# Altium PCB Balancer-v7.0.2.PcbDoc
Units mm, origin at the board's own origin, x right, y up, seen from the top; angles counter-clockwise.
Board outline 72.55 x 29.5 mm, 2 copper layers (Top Layer, Bottom Layer), stack 0.78 mm thick; 20 components, 16 nets, 58 pads, 112 vias.
Unrouted connection lines stored in the file: 10.
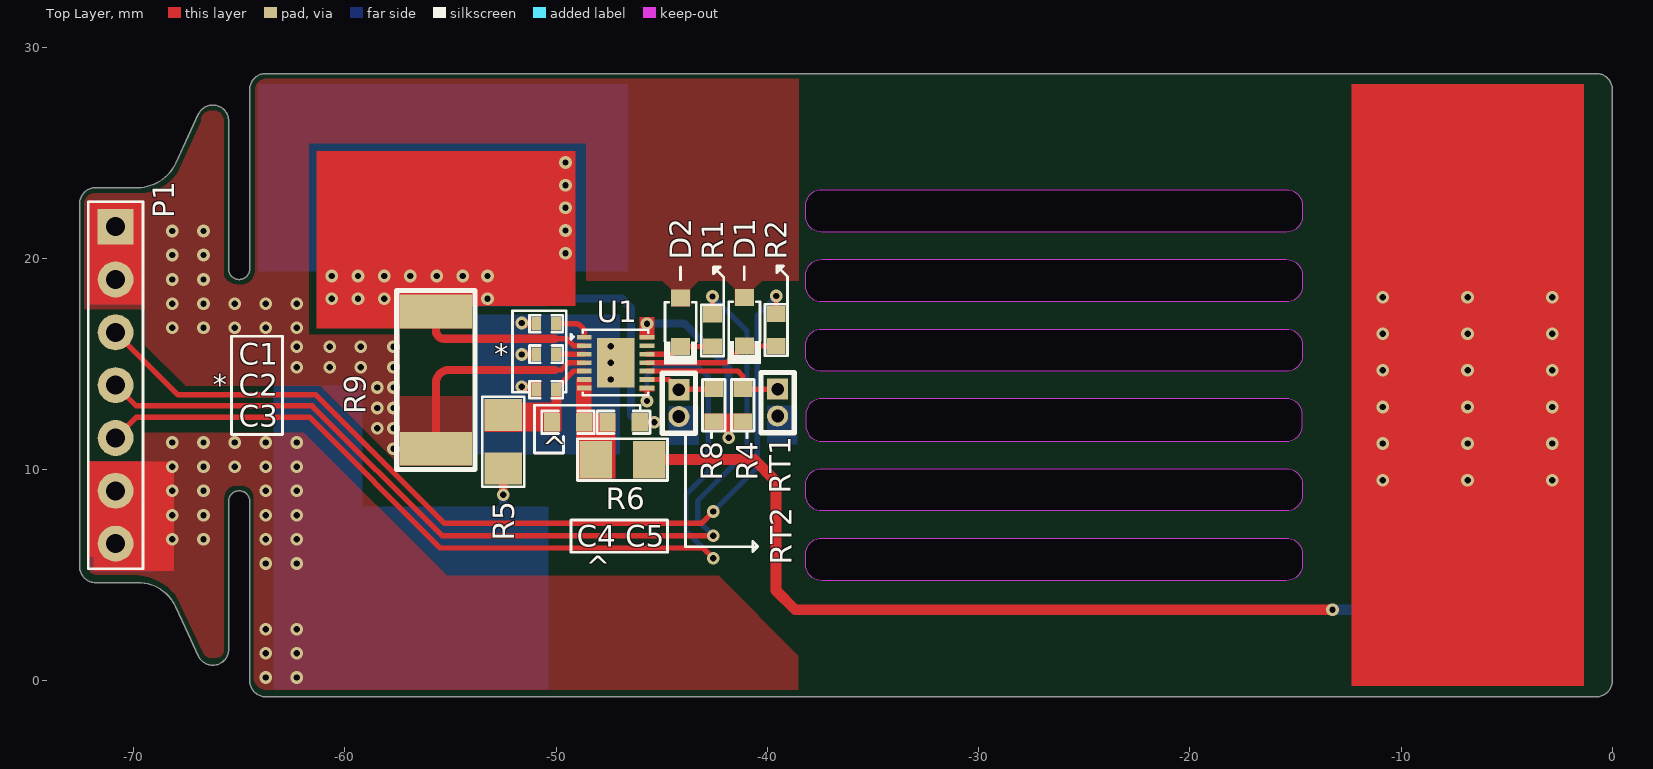
[diagram p0: Top Layer view]
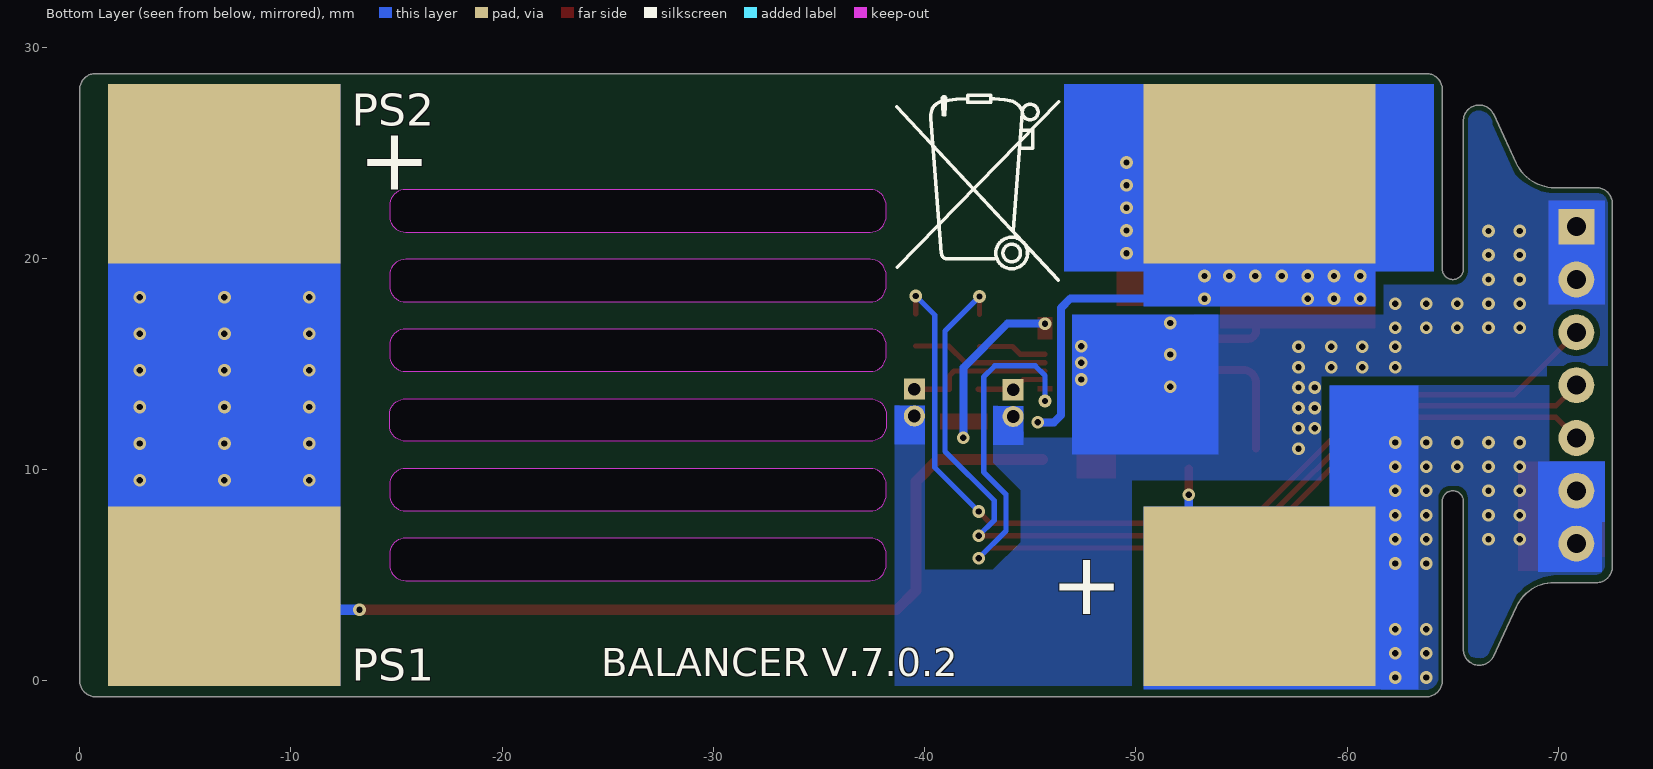
[diagram p1: Bottom Layer view, seen from below]
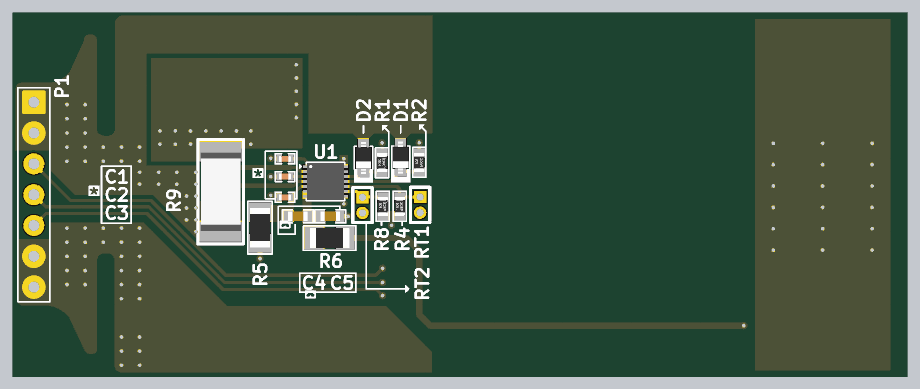
[diagram p2: 3D render of the assembled board from above, using the file's embedded part models]

## Layer stack, top to bottom
Top Solder: solder mask 0.0102, Solder Resist, Dk 3.5
Top Layer: signal copper 0.075
Dielectric 1: core 0.63, FR-4, Dk 4.8
Bottom Layer: signal copper 0.075
Bottom Solder: solder mask 0.0102, Solder Resist, Dk 3.5

## Board outline
-71.8,4.651 -69.641,4.651 cw(c-69.816,2.658) -68.003,3.503 -67.407,2.223 -66.93,1.173 ccw(c-66.25,1.489) -65.5,1.489 -65.5,8.5 cw(c-65,8.5) -64.5,8.5 -64.5,0 ccw(c-63.75,0) -63.75,-0.75 -0.75,-0.75 ccw(c-0.75,0) 0,0 0,28 ccw(c-0.75,28) -0.75,28.75 -63.75,28.75 ccw(c-63.75,28) -64.5,28 -64.5,19.5 cw(c-65,19.5) -65.5,19.5 -65.5,26.511 ccw(c-65.501,26.511) -65.5,26.511 -65.503,26.576 ccw(c-66.25,26.511) -66.099,27.245 ccw(c-66.25,26.51) -66.93,26.827 -67.416,25.785 -68.012,24.505 -68.012,24.504 cw(c-69.825,25.349) -69.825,23.349 -71.8,23.349 -71.865,23.346 ccw(c-71.8,22.599) -72.55,22.599 -72.55,5.401 ccw(c-71.8,5.401)
cut-out: -38.179,22 -38.179,22.5 cw(c-37.425,22.5) -37.425,23.254 -15.425,23.254 cw(c-15.425,22.5) -14.671,22.5 -14.671,22 cw(c-15.425,22) -15.425,21.246 -37.425,21.246 cw(c-37.425,22)
cut-out: -38.179,18.7 -38.179,19.2 cw(c-37.425,19.2) -37.425,19.954 -15.425,19.954 cw(c-15.425,19.2) -14.671,19.2 -14.671,18.7 cw(c-15.425,18.7) -15.425,17.946 -37.425,17.946 cw(c-37.425,18.7)
cut-out: -38.179,5.5 -38.179,6 cw(c-37.425,6) -37.425,6.754 -15.425,6.754 cw(c-15.425,6) -14.671,6 -14.671,5.5 cw(c-15.425,5.5) -15.425,4.746 -37.425,4.746 cw(c-37.425,5.5)
cut-out: -38.179,8.8 -38.179,9.3 cw(c-37.425,9.3) -37.425,10.054 -15.425,10.054 cw(c-15.425,9.3) -14.671,9.3 -14.671,8.8 cw(c-15.425,8.8) -15.425,8.046 -37.425,8.046 cw(c-37.425,8.8)
cut-out: -38.179,12.1 ccw(c-37.425,12.1) -37.425,11.346 -15.425,11.346 ccw(c-15.425,12.1) -14.671,12.1 -14.671,12.6 ccw(c-15.425,12.6) -15.425,13.354 -37.425,13.354 ccw(c-37.425,12.6) -38.179,12.6
cut-out: -38.179,15.4 -38.179,15.9 cw(c-37.425,15.9) -37.425,16.654 -15.425,16.654 cw(c-15.425,15.9) -14.671,15.9 -14.671,15.4 cw(c-15.425,15.4) -15.425,14.646 -37.425,14.646 cw(c-37.425,15.4)

## Design rules (kind name [scope] priority, off if disabled: settings)
Clearance [All] p1: gap=0.254 ignorepadtopadclearanceinfootprint=TRUE except(0: Arc-Hole Track-Hole SMDPad-Hole THPad-Hole Via-Hole Fill-Hole Poly-Hole Region-Hole Text-Hole; 0.127: Arc-Arc Arc-Track Track-Track; 0.152: Arc-SMDPad Track-SMDPad; 0.178: Arc-Fill Arc-Poly Arc-Region Track-Fill Track-Poly Track-Region SMDPad-Fill SMDPad-Poly SMDPad-Region)
ComponentClearance [All] p1: gap=0 collisioncheckmode=3 verticalgap=0 showdistances=FALSE
MinimumSolderMaskSliver [All] p1: minsoldermaskwidth=0
PolygonConnect [All] p1: thpad.connectstyle=Relief thpad.reliefconductorwidth=0.381 thpad.reliefentries=4 thpad.polygonreliefangle="45 Angle" thpad.airgapwidth=0.254 smdpad.connectstyle=Direct smdpad.reliefconductorwidth=0.254 smdpad.reliefentries=4 smdpad.polygonreliefangle="90 Angle" smdpad.airgapwidth=0.254 via.connectstyle=Direct via.reliefconductorwidth=0.254 via.reliefentries=4 via.polygonreliefangle="90 Angle" via.airgapwidth=0.254
RoutingVias [All] p1: holewidth=0.3 width=0.6 viastyle="Through Hole" minholewidth=0.3 minwidth=0.6 maxholewidth=0.3 maxwidth=0.6
SilkToSilkClearance [All] p1: silktosilkclearance=0
SilkToSolderMaskClearance [IsPad] p1: minsilkscreentomaskgap=0 clearancetoexposedcopper=TRUE
SolderMaskExpansion Via-Tent [IsVia] p1: expansion=0.102 istentingtop=TRUE
SolderMaskExpansion [All] p2: expansion=0.102 istentingtop=FALSE
UnRoutedNet [All] p1: checkbadconnections=TRUE
Width [All] p1: maxlimit=1.016 minlimit=0.203 preferedwidth=0.254
25 further rules are at their usual default settings.

## Components (designator, comment, footprint, x,y, rotation, side; value= is the part's Value field where it differs from the comment)
C1 "0.47uF" Cap-0402 -50.472,16.908 r0 top locked
C2 "0.47uF" Cap-0402 -50.472,15.468 r0 top locked
C3 "0.1uF" Cap-0402 -50.472,13.784 r0 top locked value=100nF
C4 "1nF" Cap-0603 -49.43,12.241 r0 top locked
C5 "1nF" Cap-0603 -46.801,12.241 r0 top locked
D1 "BZX38450-C4V7-QX" SOD-323 -41.086,17.003 r90 top
D2 "BZX38450-C4V7-QX" SOD-323 -44.107,16.98 r90 top
P1 "2.5mm" "Header CON" -70.85,13.999 r270 top locked
PS1 "3.7V" "18650 CELL PAD" -55.85,4 r0 bottom locked
PS2 "3.7V" "18650 CELL PAD" -6.85,24 r180 bottom locked
R1 "150R" Res-0603 -42.597,16.592 r90 top locked
R2 "150R" Res-0603 -39.577,16.615 r90 top locked
R4 "10K" Res-0603 -41.162,13.047 r90 top locked value=10kR
R5 "10R" Res-1206 -52.501,11.32 r90 top locked
R6 "100R" Res-1206 -46.856,10.475 r180 top locked
R8 "10K" Res-0603 -42.534,13.047 r90 top locked value=10kR
R9 "2.5mR" RES-2512 -55.691,14.241 r270 top locked
RT1 "DNP NTC 10K" Thermistor -39.511,13.174 r270 top locked
RT2 "DNP NTC 10K" Thermistor -44.185,13.149 r270 top locked
U1 "MAX17205G+" TDFN-14-EP(3x3) -47.183,15.068 r0 top locked

## Footprints (in the part's own frame and the unit in brackets; to place one, negate y for a bottom-side part, rotate by r counter-clockwise, add the part's x,y. Pads: shape width x height; smd on the part's side, far side on the other; paste and mask are expansions set on the pad)
"18650 CELL PAD" [mm]
  rect 11x8.5 smd: 1(0,0) 2(49,0)
Cap-0402 [mil]
  rect 18x25 smd mask+2.36: 1(-18.5,0) 2(18.5,0)
  silkscreen extent -31,-16 31,16, body extent -20,-10 20,10, height 19
Cap-0603 [mil]
  rect 30x35 smd mask+2.36: 1(-30,0) 2(30,0)
  silkscreen extent -49,-21 49,21, body extent -32,-16 31,16, height 34
"Header CON" [mm]
  rect 1.7x1.7 hole 0.9: 1(-7.5,0)
  round 1.7 hole 0.9: 2(-5,0) 3(-2.5,0) 4(0,0) 5(2.5,0) 6(5,0) 7(7.5,0)
  silkscreen extent -8.69,-1.3 8.69,1.3
Res-0603 [mil]
  rect 30x35 smd: 1(-30,0) 2(30,0)
  silkscreen extent -48,-21 48,21, body extent -31,-17 31,17, height 18
Res-1206 [mil]
  rect 60x70 smd: 1(-50,0) 2(50,0)
  silkscreen extent -84,-39 84,39, body extent -63,-31 63,31, height 24
RES-2512 [mm]
  rect 1.6x3.4 smd: 1(-3.25,0) 2(3.25,0)
  silkscreen extent -4.24,-1.85 4.24,1.85, body extent -3.17,-1.63 3.18,1.63, height 0.58
SOD-323 [mm]
  rect 0.8x0.9 smd mask+0.055: 1(-1.15,0) 2(1.15,0)
  silkscreen extent -2.01,-0.79 0.94,0.79, body extent -1.3,-0.67 1.3,0.67, height 1.1
TDFN-14-EP(3x3) [mm]
  rect 0.7x0.22 smd: 1(-1.485,1.2) 2(-1.485,0.8) 3(-1.485,0.4) 4(-1.485,0) 5(-1.485,-0.4) 6(-1.485,-0.8) 7(-1.485,-1.2) 8(1.485,-1.2) 9(1.485,-0.8) 10(1.485,-0.4) 11(1.485,0) 12(1.485,0.4) 13(1.485,0.8) 14(1.485,1.2)
  rect 1.78x2.35 smd paste-2: 15(0,0)
  silkscreen extent -2.11,-1.55 1.55,1.55, body extent -1.5,-1.5 1.5,1.5, height 0.77
Thermistor [mm]
  rect 1x1 hole 0.6: 1(-0.635,0)
  round 1 hole 0.6: 2(0.635,0)
  silkscreen extent -1.42,-0.79 1.42,0.79

## Part data
C1 C2: library part GRM155R71C474KE01D, "CAP CER 0.47uF, 16V, X7R, 10% Tol, 0402 Multilayer Ceramic Capacitors MLCC - SMD/SMT ROHS", LCSC Part Number=C471404, Manufacturer="Murata Electronics", Package=0402, Item Type=Capacitor, Manufacturer Part Number=GRM155R71C474KE01D
C3: library part 04023C104KAT2A, "CAP CER, 0.1 uF, 25 V, ± 10%, X7R, 0402 [1005 Metric]", Case Code (Imperial)=0402, Case Code (Metric)=1005, Dielectric=X7R, Manufacturer="Kyocera AVX", Max Operating Temperature=125°C, Min Operating Temperature=-55°C, Supplier Part Number=1867948, Tolerance=10%, Voltage=25V, Case/Package=0402, Category="Ceramic Capacitors", ComponentLink1Description=https://datasheet.ciiva.com/7614/cx7r-7614663.pdf?src-supplier=Digi-Key, ComponentLink1URL=https://datasheet.ciiva.com/7614/cx7r-7614663.pdf?src-supplier=Digi-Key, ComponentLink2Description=https://datasheet.ciiva.com/6265/cx7r-6265272.pdf?src-supplier=Digi-Key, ComponentLink2URL=https://datasheet.ciiva.com/6265/cx7r-6265272.pdf?src-supplier=Digi-Key, ComponentLink3Description=https://datasheet.ciiva.com/1123/1679506-1123344.pdf?src-supplier=Element14, ComponentLink3URL=https://datasheet.ciiva.com/1123/1679506-1123344.pdf?src-supplier=Element14, ComponentLink4Description=https://datasheet.ciiva.com/14906/cx7r-14906223.pdf?src-supplier=Digi-Key, ComponentLink4URL=https://datasheet.ciiva.com/14906/cx7r-14906223.pdf?src-supplier=Digi-Key, ComponentLink5Description=https://datasheet.ciiva.com/7709/1679506-7709527.pdf?src-supplier=Element14, ComponentLink5URL=https://datasheet.ciiva.com/7709/1679506-7709527.pdf?src-supplier=Element14, ComponentLink6Description=Farnell, ComponentLink6URL=https://uk.farnell.com/avx/04023c104kat2a/cap-0-1-f-25v-10-x7r-0402/dp/1867948, Item Type=Capacitor, Lead Free=5697LeadFree, Manufacturer Part Number=04023C104KAT2A, Material=4241ConductorMaterial, Mounting Technology="Surface Mount", Packaging="Cut Tape", Pins=2, Pricing="10=0.027, 100=0.014, 500=0.009, 2500=0.007, 5000=0.0069 (GBP)", Reach SVHC Compliant=No, RoHS=Yes, RoHS Compliant=Yes, Series=-, Stock=226682, Supplier=Farnell, Voltage Rating=25V, Voltage Rating (DC)=25V, Width=1mm
C4 C5: library part C0603C102K3RACAUTO, "CAP CER, 1000 pF, 25 V, ± 10%, X7R, 0603 [1608 Metric]", Case Code (Imperial)=0603, Case Code (Metric)=1608, Dielectric=X7R, Dielectric Material=Ceramic, Manufacturer=KEMET, Max Operating Temperature=125°C, Min Operating Temperature=-55°C, Package Quantity=1, Ratings=AEC-Q200, Supplier Part Number=07X0745, Tolerance=10%, Voltage Rating=25V, Category="Ceramic Capacitors", ComponentLink1Description=https://datasheet.ciiva.com/23913/1751276-23913166.pdf?src-supplier=Newark, ComponentLink1URL=https://datasheet.ciiva.com/23913/1751276-23913166.pdf?src-supplier=Newark, ComponentLink2Description=https://datasheet.ciiva.com/26847/getdatasheetpartid-429233-26847500.pdf?src-supplier=Verical, ComponentLink2URL=https://datasheet.ciiva.com/26847/getdatasheetpartid-429233-26847500.pdf?src-supplier=Verical, ComponentLink3Description=Newark, ComponentLink3URL=https://www.newark.com/kemet/c0603c102k3racauto/mlcc-capacitor-1000pf-25v-x7r/dp/07X0745, Construction=Flat, Depth=0.8mm, Height=0.8mm, Item Type=Capacitor, Length=1.6mm, Manufacturer Part Number=C0603C102K3RACAUTO, Mounting Technology="Surface Mount", Package=0603, Packaging="Cut Tape", Pricing="1=0.014 (USD)", Radiation Hardening=No, Reach SVHC Compliant=No, RoHS=Yes, RoHS Compliant=Yes, Series=C, Stock=3765, Supplier=Newark, Thickness=0.034inch, Voltage Rating (DC)=25V, Width=0.031inch
D1 D2: "Zener Diode 4.7 V 300 mW ±5% Surface Mount SOD-323", Manufacturer="Nexperia USA Inc.", Package="SC-76, SOD-323", ComponentLink1Description=Farnell, ComponentLink1URL=https://uk.farnell.com/nexperia/bzx38450-c4v7-qx/zener-diode-4-7v-0-3w-sc-76/dp/3868843, ComponentLink2Description=Digikey, ComponentLink2URL=https://www.digikey.com/en/products/detail/nexperia-usa-inc/BZX38450-C4V7-QX/16368564, Item Type=Diode, Manufacturer Part Number=BZX38450-C4V7-QX
P1: library part "Header CON 2.5mm", "2.5mm Pitch, 7 Pin header Connector"
PS1 PS2: library part "18650 CELL", "Will only be pads on PCB for Welding. Not CELL holder"
R1 R2: library part MCWR06X1500FTL, "SMD RES, 150 Ohm, General Purpose Thick Film 0603 1% 1/10W ±100ppm/°C Ceramic Paper T/R", Case Code (Imperial)=0603, Case Code (Metric)=1608, Manufacturer=Multicomp, Power Rating=100mW, Resistance Tolerance=1%, Resistor Type="Thick Film", Supplier Part Number=2446572, Temperature Coefficient=100ppm/°C, Voltage Rating=50V, Case/Package=0603, ComponentLink1Description=http://www.farnell.com/datasheets/2563624.pdf?src-supplier=Farnell, ComponentLink1URL=http://www.farnell.com/datasheets/2563624.pdf?src-supplier=Farnell, ComponentLink2Description=http://www.farnell.com/datasheets/2860681.pdf?src-supplier=Farnell, ComponentLink2URL=http://www.farnell.com/datasheets/2860681.pdf?src-supplier=Farnell, ComponentLink3Description=https://datasheet.octopart.com/MCWR06X1500FTL-Multicomp-datasheet-100454308.pdf?src-supplier=Farnell, ComponentLink3URL=https://datasheet.octopart.com/MCWR06X1500FTL-Multicomp-datasheet-100454308.pdf?src-supplier=Farnell, ComponentLink4Description=http://www.farnell.com/datasheets/1849611.pdf?src-supplier=Element14, ComponentLink4URL=http://www.farnell.com/datasheets/1849611.pdf?src-supplier=Element14, ComponentLink5Description=http://www.farnell.com/datasheets/2563624.pdf?src-supplier=Newark, ComponentLink5URL=http://www.farnell.com/datasheets/2563624.pdf?src-supplier=Newark, Item Type=Resistor, Manufacturer Part Number=MCWR06X1500FTL, Packaging="Tape and Reel", Pricing="5000=0.001, 25000=0.0009, 50000=0.0008 (GBP)", Reach SVHC Compliant=No, RoHS=Yes, Stock=85000, Supplier=Farnell, Voltage Rating (DC)=50V
R4 R8: library part RE0603DRE0710KL, "SMD RES, 10KOhm, ± 0.5%, 100 mW, 0603 [1608 Metric], Thick Film, Ultra Precision", Case/Package=0603, Manufacturer=Yageo, Max Operating Temperature=155°C, Max Power Dissipation=100mW, Min Operating Temperature=-55°C, Supplier Part Number=1840588, Temperature Coefficient=50ppm/°C, Tolerance=0.5%, Category="Chip SMD Resistors", ComponentLink1Description=http://www.yageo.com/NewPortal/yageodocoutput?fileName=/pdf/R-Chip/PYu-RE_105_RoHS_L_6.pdf&src-supplier=Digi-Key, ComponentLink1URL=http://www.yageo.com/NewPortal/yageodocoutput?fileName=/pdf/R-Chip/PYu-RE_105_RoHS_L_6.pdf&src-supplier=Digi-Key, ComponentLink2Description=Farnell, ComponentLink2URL=https://uk.farnell.com/yageo/re0603dr-0710kl/res-10k-0-5-0-1w-0603-thick-film/dp/1840588, Features="Moisture Resistant", Height=0.022inch, Item Type=Resistor, Length=0.063inch, Manufacturer Part Number=RE0603DRE0710KL, Number of Terminations=2, Packaging="Tape and Reel", Pricing="10=0.025, 100=0.014, 500=0.013, 1000=0.011, 2500=0.009, 5000=0.007, 25000=0.006, 50000=0.005 (GBP)", RoHS=Yes, RoHS Compliant=Yes, Series=RE, Stock=3920, Supplier=Farnell, Width=0.032inch
R5: library part RC1206FR-0710RL, "SMD RES, 10 Ohm, ± 1%, 250 mW, 1206 [3216 Metric], Thick Film, General Purpose", Case Code (Metric)=3216, Case/Package=1206, Manufacturer=Yageo, Max Operating Temperature=155°C, Max Power Dissipation=250mW, Min Operating Temperature=-55°C, Resistance Tolerance=1%, Resistor Type="Thick Film", Supplier Part Number=2421908, Temperature Coefficient=200ppm/°C, Voltage Rating=200V, Category="Chip SMD Resistors", ComponentLink1Description=https://datasheet.ciiva.com/11819/0900766b80c6630a-11819896.pdf?src-supplier=Rs, ComponentLink1URL=https://datasheet.ciiva.com/11819/0900766b80c6630a-11819896.pdf?src-supplier=Rs, ComponentLink2Description=https://datasheet.ciiva.com/22735/444357-22735648.pdf?src-supplier=Farnell, ComponentLink2URL=https://datasheet.ciiva.com/22735/444357-22735648.pdf?src-supplier=Farnell, ComponentLink3Description=https://datasheet.ciiva.com/29181/402303-da-01-en-smd-widerstand-chip1206-10-ohm-29181572.pdf?src-supplier=Conrad, ComponentLink3URL=https://datasheet.ciiva.com/29181/402303-da-01-en-smd-widerstand-chip1206-10-ohm-29181572.pdf?src-supplier=Conrad, ComponentLink4Description=https://datasheet.ciiva.com/46445/444357-46445704.pdf?src-supplier=Element14, ComponentLink4URL=https://datasheet.ciiva.com/46445/444357-46445704.pdf?src-supplier=Element14, ComponentLink5Description=https://datasheet.ciiva.com/2460/pyu-rc1206-51-rohs-l-4-2460048.pdf?src-supplier=Digi-Key, ComponentLink5URL=https://datasheet.ciiva.com/2460/pyu-rc1206-51-rohs-l-4-2460048.pdf?src-supplier=Digi-Key, ComponentLink6Description=https://datasheet.ciiva.com/2460/pyu-rc1206-51-rohs-l-4-2460049.pdf?src-supplier=Digi-Key, ComponentLink6URL=https://datasheet.ciiva.com/2460/pyu-rc1206-51-rohs-l-4-2460049.pdf?src-supplier=Digi-Key, ComponentLink7Description=https://datasheet.ciiva.com/2460/pyu-rc1206-51-rohs-l-4-2460050.pdf?src-supplier=Digi-Key, ComponentLink7URL=https://datasheet.ciiva.com/2460/pyu-rc1206-51-rohs-l-4-2460050.pdf?src-supplier=Digi-Key, ComponentLink8Description=https://datasheet.ciiva.com/16962/pyu-rc1206-51-rohs-l-4-16962857.pdf?src-supplier=Future+Electronics, ComponentLink8URL=https://datasheet.ciiva.com/16962/pyu-rc1206-51-rohs-l-4-16962857.pdf?src-supplier=Future+Electronics, ComponentLink9Description=Farnell, ComponentLink9URL=https://uk.farnell.com/yageo/rc1206fr-0710rl/res-10r-1-0-25w-1206-thick-film/dp/2421908, Depth=1.6mm, Features="Moisture Resistant", Height=0.55mm, Item Type=Resistor, Lead Free="Lead Free", Length=3.1mm, Manufacturer Part Number=RC1206FR-0710RL, Number of Terminations=2, Package=1206, Packaging="Tape and Reel", Pins=2, Power Rating=250mW, Pricing="5000=0.016, 25000=0.014, 50000=0.012 (GBP)", Reach SVHC Compliant=No, RoHS=Yes, RoHS Compliant=Yes, Series=RC, Stock=95000, Supplier=Farnell, Technology="THICK FILM", Termination=SMD/SMT, Tolerance=1%, Voltage Rating (AC)=200V, Voltage Rating (DC)=200V, Width=1.6mm
R6: library part RC1206FR-07100RL, "SMD RES, 100 Ohm, ± 1%, 250 mW, 1206 [3216 Metric], Thick Film, General Purpose", Case Code (Imperial)=1206, Case Code (Metric)=3216, Manufacturer=Yageo, Max Operating Temperature=155°C, Max Power Dissipation=250mW, Min Operating Temperature=-55°C, Package Quantity=5000, Resistance Tolerance=1%, Resistor Type="Thick Film", Supplier Part Number=9240888, Temperature Coefficient=100ppm/°C, Voltage Rating=200V, Category="Chip SMD Resistors", ComponentLink1Description=https://datasheet.ciiva.com/11808/0900766b80c6630a-11808606.pdf?src-supplier=Rs, ComponentLink1URL=https://datasheet.ciiva.com/11808/0900766b80c6630a-11808606.pdf?src-supplier=Rs, ComponentLink2Description=https://datasheet.ciiva.com/46445/444357-46445702.pdf?src-supplier=Element14, ComponentLink2URL=https://datasheet.ciiva.com/46445/444357-46445702.pdf?src-supplier=Element14, ComponentLink3Description=https://datasheet.ciiva.com/7857/444357-7857241.pdf?src-supplier=Element14, ComponentLink3URL=https://datasheet.ciiva.com/7857/444357-7857241.pdf?src-supplier=Element14, ComponentLink4Description=https://datasheet.ciiva.com/7857/444357-7857242.pdf?src-supplier=Element14, ComponentLink4URL=https://datasheet.ciiva.com/7857/444357-7857242.pdf?src-supplier=Element14, ComponentLink5Description=Farnell, ComponentLink5URL=https://uk.farnell.com/yageo/rc1206fr-07100rl/res-100r-1-0-25w-1206-thick-film/dp/9240888, Depth=1.6mm, Features="Moisture Resistant", Height=0.55mm, Item Type=Resistor, Lead Free="Lead Free", Length=3.1mm, Manufacturer Part Number=RC1206FR-07100RL, Number of Terminations=2, Package=1206, Packaging="Tape and Reel", Power Rating=250mW, Pricing="10=0.022, 100=0.013, 500=0.011, 1000=0.009, 2500=0.0088 (GBP)", Reach SVHC Compliant=Unknown, RoHS=Yes, RoHS Compliant=Yes, Series=RC, Stock=538979, Supplier=Farnell, Technology="THICK FILM", Termination=SMD/SMT, Tolerance=1%, Voltage Rating (AC)=200V, Width=1.6mm
R9: library part PA2512FKF7W2U5E, "SMD Current Sense Resistor, 0.0025 ohm, PA Series, 2512 [6432 Metric], 2W, ± 1%, Metal Strip", Manufacturer=YAGEO, Package=2512, ComponentLink1Description=Farnell, ComponentLink1URL=https://nl.farnell.com/yageo/pa2512fkf7w2u5e/res-r0025-1-2w-2512-metal-strip/dp/4169831, Item Type=Resistor, Manufacturer Part Number=PA2512FKF7W2U5E
RT1 RT2: library part Thermister, "NTC Thermister 10K"
U1: "Stand-Alone ModelGauge m5 Fuel Gauge with SHA-256 Authentication", Manufacturer=Maxim, Max Operating Temperature=85°C, Max Supply Voltage=20V, Min Operating Temperature=-40°C, Min Supply Voltage=4.2V, Package=TDFN-14-EP(3x3), Category="Battery Management", ComponentLink1Description=http://www.farnell.com/datasheets/2339113.pdf?src-supplier=Farnell, ComponentLink1URL=http://www.farnell.com/datasheets/2339113.pdf?src-supplier=Farnell, ComponentLink2Description=http://www.mouser.com/ds/2/256/MAX17201-MAX17215-909430.pdf?src-supplier=Mouser, ComponentLink2URL=http://www.mouser.com/ds/2/256/MAX17201-MAX17215-909430.pdf?src-supplier=Mouser, ComponentLink3Description=https://datasheets.maximintegrated.com/en/ds/MAX17201-MAX17215.pdf?src-supplier=Digi-Key, ComponentLink3URL=https://datasheets.maximintegrated.com/en/ds/MAX17201-MAX17215.pdf?src-supplier=Digi-Key, ComponentLink4Description=http://www.farnell.com/datasheets/2034561.pdf?src-supplier=Element14, ComponentLink4URL=http://www.farnell.com/datasheets/2034561.pdf?src-supplier=Element14, Interface=I2C, Item Type=IC, Manufacturer Part Number=MAX17205G+, Number of Pins=14, Packaging=Rail/Tube, Pricing 1="1=6.58, 10=5.913, 25=5.5904, 80=4.845, 230=4.59652, 490=4.12443, 980=3.47844, 2450=3.30452 (USD)", Reach SVHC Compliant=Unknown, RoHS=Yes, RoHS Compliant=Yes, Series=ModelGauge™, Stock 1=490, Supplier 1=Digi-Key

## Via types
v1: diameter 0.6, hole 0.3, Top Layer to Bottom Layer, tented both sides, 112 vias

## Nets (pads, with @x,y where several pads share a name; then routed paths per layer and width w, separated by ;. In a path a pad name is that pad's centre, name@x,y a point inside that pad or via, vN(x,y) a via of type N, cw(c..) or ccw(c..) an arc to the next point about the centre after c; other vN are vias at no path point)
ALRT: P1.5 U1.8 | length 46.1
  Top Layer w0.254: P1.5 -69.867,12.482 -61.682,12.482 -55.491,6.291 -43.042,6.291 v1(-42.559,5.808) ; U1.8@-45.698,13.819 -45.698,13.253 v1(-45.696,13.251)
  Bottom Layer w0.254: v1(-45.696,13.251) -45.696,14.449 -45.227,14.918 -43.321,14.918 -42.788,14.384 -42.788,9.895 -43.851,8.832 -43.851,7.101 v1(-42.559,5.808)
C1: P1.6 P1.7 PS1.1 R5.1 | length 9.9
  Top Layer w0.381: P1.7 P1.6 ; v1(-52.501,8.806) R5.1
  Bottom Layer w0.381: PS1.1 -52.501,7.349 v1(-52.501,8.806)
  other v1: -63.743,0.16 -62.27,0.16 -63.743,1.303 -62.27,1.303 -63.743,2.446 -62.27,2.446 -63.743,5.554 -62.27,5.554 -68.163,6.697 -66.689,6.697 -63.743,6.697 -62.27,6.697 -68.163,7.84 -66.689,7.84 -63.743,7.84 -62.27,7.84 -68.163,8.999 -66.689,8.999 -63.743,8.999 -62.27,8.999 -68.163,10.142 -66.689,10.142 -65.216,10.142 -63.743,10.142 -62.27,10.142 -68.163,11.285 -66.689,11.285 -65.216,11.285 -63.743,11.285 -62.27,11.285
C2: PS1.2 PS2.1 R6.1 | length 45
  Top Layer w0.508: R6.1 -40.621,10.475 -39.59,9.444 -39.59,4.279 -38.681,3.37 v1(-13.248,3.37)
  Bottom Layer w0.508: v1(-13.248,3.37) -7.48,3.37 PS1.2
  other v1: -10.86,9.502 -6.85,9.502 -2.84,9.502 -10.86,11.235 -6.85,11.235 -2.84,11.235 -10.86,12.968 -6.85,12.968 -2.84,12.968 -10.86,14.701 -6.85,14.701 -2.84,14.701 -10.86,16.434 -6.85,16.434 -2.84,16.434 -10.86,18.167 -6.85,18.167 -2.84,18.167
C2-: C5.2 PS2.2 R9.1 U1.2 | length 23.9
  Top Layer w0.254: -50.052,16.197 -49.501,16.197 -49.172,15.868 U1.2
  Top Layer w0.381: R9.1 -55.691,16.591 ccw(c-55.297,16.591) -55.297,16.197 -50.052,16.197 ; C5.2 v1(-45.348,12.241)
  Bottom Layer w0.381: PS2.2@-55.85,22.986 PS2.2@-55.311,22.986 ; v1(-54.414,19.169) v1@-54.277,19.306 ; v1(-53.245,18.096) -46.893,18.096 -46.454,17.657 -46.454,12.576 -46.119,12.241 v1(-45.348,12.241) ; PS2.2@-52.266,19.941 -52.266,19.402 -52.033,19.169
  other v1: -60.619,18.096 -59.378,18.096 -58.137,18.096 -60.619,19.169 -59.378,19.169 -58.137,19.169 -56.896,19.169 -55.655,19.169 -53.245,19.169 -49.555,20.25 -49.555,21.322 -49.555,22.395 -49.555,23.467 -49.555,24.54
GND: C1.1 C2.1 C3.1 D1.2 D2.2 P1.1 P1.2 R9.2 RT1.2 RT2.2 U1.4 U1.15 | length 12.8
  Top Layer w0.254: v1@-51.602,15.453 v1@-51.594,15.46 ; C2.1@-50.925,15.46 C2.1@-50.917,15.468 ; -50.052,14.719 -49.754,14.719 -49.405,15.068 U1.4
  Top Layer w0.381: R9.2 -55.691,14.089 cw(c-55.061,14.089) -55.061,14.719 -50.052,14.719 ; v1@-51.619,15.46 C2.1@-50.95,15.46 ; v1@-51.61,16.925 C1.1@-50.958,16.925 ; v1@-51.602,16.942 v1@-51.585,16.925 ; v1@-51.585,13.889 -51.615,13.919 -51.01,13.919 -50.942,13.851 C3.1 ; C1.1@-50.933,16.925 C1.1@-50.916,16.909
  other v1: -57.698,10.99 -58.46,11.955 -57.698,11.955 -58.46,12.92 -57.698,12.92 -58.46,13.886 -57.698,13.886 -51.627,13.931 -47.411,14.267 -62.27,14.851 -60.72,14.851 -59.247,14.851 -57.698,14.851 -47.411,15.054 -51.627,15.453 -62.27,15.816 -60.72,15.816 -59.247,15.816 -57.698,15.816 -47.411,15.841 -68.163,16.713 -66.689,16.713 -65.216,16.713 -63.743,16.713 -62.27,16.713 -51.627,16.942 -68.163,17.856 -66.689,17.856 -65.216,17.856 -63.743,17.856 -62.27,17.856 -68.163,18.999 -66.689,18.999 -68.163,20.158 -66.689,20.158 -68.163,21.301 -66.689,21.301
NetC1_2: C1.2 U1.1 | length 1.7
  Top Layer w0.254: C1.2@-49.977,16.908 -49.108,16.908 cw(c-49.108,16.468) -48.668,16.468 U1.1@-48.668,16.285
NetC2_2: C2.2 U1.3 | length 1.3
  Top Layer w0.254: C2.2@-49.977,15.468 U1.3
NetC3_2: C3.2 C4.1 R5.2 U1.5 | length 1.9
  Top Layer w0.254: C3.2@-50.079,13.771 -49.876,13.975 -49.865,13.975 -49.172,14.668 U1.5
  Top Layer w0.381: R5.2@-52.501,12.844 R5.2@-52.374,12.844
NetC4_2: C4.2 C5.1 R6.2 U1.6 U1.7
NetD1_1: D1.1 R2.1 U1.11 | length 6.4
  Top Layer w0.254: U1.11 -41.921,15.068 -41.136,15.853 D1.1 R2.1
NetD2_1: D2.1 R1.1 U1.12 | length 3.3
  Top Layer w0.254: U1.12 -44.519,15.468 -44.157,15.83 D2.1 R1.1
NetR4_2: R4.2 RT1.1 U1.10 | length 6.9
  Top Layer w0.254: U1.10 -41.398,14.668 -41.162,14.432 R4.2 RT1.1
NetR8_2: R8.2 RT2.1 U1.9 | length 3.4
  Top Layer w0.254: U1.9 -44.669,14.268 RT2.1 -44.16,13.809 R8.2@-42.625,13.809 ; R8.2@-42.65,13.784 R8.2@-42.625,13.809 ; R8.2 R8.2@-42.625,13.809
SCL: P1.3 R2.2 | length 44.5
  Top Layer w0.254: P1.3 -67.888,13.538 -61.363,13.538 -55.284,7.459 -43.118,7.459 v1(-42.559,8.018) ; R2.2 v1(-39.577,18.22)
  Bottom Layer w0.254: v1(-42.559,8.018) -40.477,10.101 -40.477,17.32 v1(-39.577,18.22)
SDA: P1.4 R1.2 | length 45.4
  Top Layer w0.254: P1.4 -69.874,13.023 -61.549,13.023 -55.401,6.875 v1(-42.559,6.875) ; R1.2 v1(-42.597,18.197)
  Bottom Layer w0.254: v1(-42.597,18.197) -40.959,16.559 -40.959,10.864 -43.297,8.527 -43.297,7.613 v1(-42.559,6.875)
THRM: R4.1 R8.1 U1.14 | length 8.8
  Top Layer w0.254: v1@-45.697,16.907 v1(-45.696,16.908)
  Top Layer w0.381: v1(-41.83,11.515) -41.83,12.241
  Bottom Layer w0.381: v1(-45.696,16.908) -43.912,16.908 -41.83,14.827 v1(-41.83,11.515)
pads on no net: U1.13

## Polygon pours and split planes (outlines as drawn)
C1 on Top Layer "C1_L01_P006" (solid, pour order 6): -42.308,4.97 -38.532,1.194 -38.532,-0.415 -63.718,-0.415 cw(c-63.718,0.17) -64.302,0.17 -64.302,8.679 ccw(c-64.86,8.679) -64.861,9.237 -65.14,9.237 ccw(c-65.14,8.653) -65.724,8.653 -65.724,1.714 -65.724,1.458 cw(c-66.086,1.446) -66.074,1.084 -66.232,1.084 cw(c-66.294,1.558) -66.734,1.37 -68.005,4.077 -68.206,4.277 ccw(c-70.002,2.482) -70.002,5.021 -71.729,5.021 cw(c-71.729,5.493) -72.201,5.493 -72.201,10.395 -69.56,10.395 -69.56,11.752 -61.94,11.752 -55.158,4.97
GND on Top Layer "GND_L01_P003" (solid, pour order 3): -41.933,18.95 -43.237,18.95 -43.657,18.53 -43.657,17.73 -44.557,17.73 -44.557,18.53 -44.976,18.95 -48.565,18.95 -48.565,25.451 -61.697,25.451 -61.697,16.383 -57.391,16.383 -57.391,13.467 -53.991,13.467 -53.991,10.191 -57.381,10.191 -58.185,10.985 -61.162,13.962 -67.542,13.962 -69.452,15.872 -69.452,17.594 -72.328,17.594 -72.328,22.555 -72.325,22.559 -72.325,22.594 cw(c-71.817,22.594) -72.176,22.953 cw(c-71.87,22.648) -71.869,23.08 -69.687,23.08 ccw(c-69.686,25.11) -68.251,23.675 -67.926,24 -66.791,26.484 -66.791,26.565 cw(c-66.364,26.565) -66.364,26.992 -66.162,26.992 cw(c-66.162,26.624) -65.9,26.884 cw(c-66.328,26.454) -65.722,26.454 -65.722,19.239 ccw(c-65.39,19.239) -65.625,19.005 ccw(c-65.04,19.59) -65.04,18.762 -64.886,18.762 ccw(c-64.886,19.397) -64.251,19.397 -64.251,27.932 cw(c-63.667,27.932) -63.667,28.516 -38.521,28.516 -38.521,18.95 -40.239,18.95 -40.636,18.553 -40.636,17.753 -41.536,17.753 -41.536,18.553
C1 on Bottom Layer "C1_L02_P000" (solid, pour order 0): -69.56,13.987 -59.171,13.987 -59.171,8.25 -50.35,8.25 -50.35,-0.415 -63.718,-0.415 cw(c-63.718,0.17) -64.302,0.17 -64.302,8.679 ccw(c-64.86,8.679) -64.861,9.237 -65.14,9.237 ccw(c-65.14,8.653) -65.724,8.653 -65.724,1.714 -65.724,1.458 cw(c-66.086,1.446) -66.074,1.084 -66.232,1.084 cw(c-66.294,1.558) -66.734,1.37 -68.005,4.077 -68.206,4.277 ccw(c-70.002,2.482) -70.002,5.021 -71.729,5.021 cw(c-71.729,5.493) -72.201,5.493 -72.201,10.395 -69.56,10.395
GND on Bottom Layer "GND_L02_P004" (solid, pour order 4): -44.538,6.568 -43.22,5.25 -40.011,5.25 -40.011,13.047 -38.572,13.047 -38.572,-0.237 -49.798,-0.237 -49.798,9.491 -58.765,9.491 -58.765,11.515 -44.685,11.515 -44.685,13.022 -43.245,13.022 -43.245,10.323 -44.538,9.03
GND on Bottom Layer "GND_L02_P002" (solid, pour order 2): -61.722,18.762 -61.722,17.34 -52.796,17.34 -52.796,9.491 -58.765,9.491 -58.765,14.419 -69.458,14.419 -69.458,14.927 -72.328,14.927 -72.328,22.586 cw(c-71.808,22.586) -72.176,22.953 cw(c-71.869,22.647) -71.869,23.08 -69.9,23.08 ccw(c-69.9,25.62) -68.104,23.824 -67.934,23.995 -66.867,26.357 cw(c-66.232,26.357) -66.232,26.992 -66.207,26.992 cw(c-66.207,26.509) -65.724,26.509 -65.724,19.372 ccw(c-65.115,19.372) -65.115,18.762

## Other copper
Top Layer:
  rectangle net GND: -51.181,13.462 -50.698,14.148
  rectangle net NetC3_2: -53.39,11.791 -51.612,13.352
  rectangle net THRM: -46.048,16.158 -45.348,17.228
  rectangle net C2-: -61.35,17.755 -49.073,25.095
  rectangle net C2-: -61.35,16.691 -53.991,21.277
  rectangle net THRM: -42.978,11.904 -40.718,12.666
  rectangle net NetC3_2: -53.39,11.796 -49.749,13.174
  rectangle net NetC3_2: -53.39,11.791 -51.612,13.352
  rectangle net NetC3_2: -50.206,11.796 -49.749,14.102
  rectangle net NetC4_2: -49.049,9.586 -47.182,12.685
  rectangle net NetC4_2: -49.049,11.796 -47.182,12.685
  rectangle net GND: -72.217,17.823 -69.534,22.742
  rectangle net C1: -71.909,5.201 -68.083,5.862
  rectangle net C1: -72.201,5.862 -68.083,10.395
  rectangle net C2: -12.35,-0.25 -1.35,28.25
  rectangle net ALRT: -46.048,13.693 -45.348,13.956
  rectangle net NetC4_2: -49.049,9.586 -48.318,14.317
Bottom Layer:
  rectangle net C2-: -64.111,19.372 -46.584,28.25
  rectangle net C1: -72.063,5.159 -69.03,8.978
  rectangle net C1: -72.201,7.528 -69.03,10.395
  rectangle net C1: -63.387,5.317 -59.171,13.987
  rectangle net C1: -63.387,-0.415 -50.35,8.25
  rectangle net GND: -40.011,11.193 -38.572,13.047
  rectangle net GND: -44.685,11.168 -43.245,13.022
  rectangle net GND: -53.899,10.719 -46.979,17.34
  rectangle net C2-: -61.35,17.721 -50.35,28.25
  rectangle net GND: -72.217,17.823 -69.534,22.742
  rectangle net C2: -12.35,-0.25 -1.35,28.25

## Silkscreen, mask and mechanical layers (free items; w line width, h text height)
Top Overlay:
  lines w0.127: -51.308,13.665 -52.059,13.665 -52.059,17.526 -49.53,17.526 ; -49.652,11.569 -49.652,10.787 -51.018,10.787 -51.018,13.047 -50.168,13.047 -46.014,13.047 -46.014,12.838 ; -49.643,13.657 -49.53,13.657 ; -49.521,13.657 -49.521,17.518 ; -44.107,18.986 -44.107,19.596 ; -43.873,11.727 -43.873,6.356 -40.45,6.356 ; -42.646,11.515 -42.646,11.828 ; -42.394,19.427 -42.546,19.274 -42.546,19.596 ; -42.377,19.443 -42.225,19.596 -42.546,19.596 ; -42.064,17.811 -42.064,19.114 -42.546,19.596 ; -41.086,18.986 -41.086,19.596 ; -40.962,11.515 -40.962,11.828 ; -39.399,19.475 -39.551,19.323 -39.551,19.644 ; -39.382,19.492 -39.23,19.644 -39.551,19.644 ; -39.044,17.834 -39.044,19.136 -39.551,19.644 ; -40.45,6.356 -40.69,6.116 -40.69,6.356 -40.69,6.596 -40.45,6.356 ; -65.362,11.668 -62.949,11.668 -62.949,16.316 -65.362,16.316 -65.362,11.668 ; -49.29,6.088 -44.726,6.088 -44.726,7.612 -49.29,7.612 -49.29,6.088
  text "*" at -52.937,14.969 h1
  text "*" at -66.253,13.526 h1
  text "^" at -50.645,10.567 h1.02
  text "^" at -48.599,4.904 h1.02
Bottom Overlay:
  lines w0.083: -114.767,-0.641 cw(c-114.737,-0.669) -114.707,-0.697 ; -45.16,25.225 ccw(c-45.118,25.225) -45.077,25.225 ; -45.16,26.078 cw(c-45.118,26.078) -45.077,26.078 ; -45.118,25.183 cw(c-45.118,25.225) -45.118,25.267 ; -45.118,26.036 cw(c-45.118,26.078) -45.118,26.119 ; -44.661,26.886 cw(c-44.619,26.889) -44.578,26.892 ; -44.661,26.89 ccw(c-44.619,26.889) -44.578,26.888 ; -44.64,26.036 ccw(c-44.64,26.078) -44.64,26.119 ; -44.598,25.183 ccw(c-44.598,25.225) -44.598,25.267 ; -44.245,21.313 ccw(c-44.203,21.316) -44.162,21.319 ; -43.288,19.943 cw(c-43.288,19.985) -43.288,20.026 ; -43.205,27.512 ccw(c-43.205,27.554) -43.205,27.596 ; -43.164,27.388 ccw(c-43.122,27.388) -43.08,27.388 ; -43.164,27.72 cw(c-43.122,27.72) -43.08,27.72 ; -43.122,27.346 cw(c-43.122,27.388) -43.122,27.429 ; -43.122,27.679 cw(c-43.122,27.72) -43.122,27.762 ; -42.082,27.388 ccw(c-42.041,27.388) -41.999,27.388 ; -42.082,27.72 cw(c-42.041,27.72) -41.999,27.72 ; -42.042,27.512 cw(c-42.041,27.554) -42.039,27.596 ; -42.041,27.346 ccw(c-42.041,27.388) -42.041,27.429 ; -42.041,27.679 ccw(c-42.041,27.72) -42.041,27.762 ; -41.042,27.552 cw(c-41.001,27.554) -40.959,27.556 ; -41.042,27.549 ccw(c-41.001,27.554) -40.96,27.559 ; -41.001,26.803 ccw(c-40.959,26.805) -40.918,26.808 ccw(c-40.876,26.805) -40.835,26.803 ; -40.959,26.764 cw(c-40.959,26.805) -40.959,26.847 ; -40.876,26.764 ccw(c-40.876,26.805) -40.876,26.847 ; -40.876,27.556 cw(c-40.835,27.554) -40.793,27.552 ; -40.876,27.559 ccw(c-40.835,27.554) -40.793,27.549 ; -40.835,20.234 cw(c-40.793,20.234) -40.751,20.234 ; -40.835,20.238 ccw(c-40.793,20.234) -40.752,20.231 ; -40.336,26.639 ccw(c-40.294,26.639) -40.252,26.639 ; -40.335,26.642 cw(c-40.294,26.639) -40.252,26.636 ; -44.57,27.162 ccw(c-44.536,27.138) -44.502,27.114 ccw(c-44.536,27.138) -44.57,27.162 ; -44.046,27.511 cw(c-44.037,27.471) -44.028,27.43 cw(c-44.037,27.471) -44.046,27.511 ; -43.288,27.512 ccw(c-43.288,27.554) -43.288,27.596 ccw(c-43.288,27.554) -43.288,27.512 ; -42.082,27.554 cw(c-42.041,27.554) -41.999,27.554 cw(c-42.041,27.554) -42.082,27.554 ; -41.043,19.943 ccw(c-41.043,19.985) -41.043,20.026 ccw(c-41.043,19.985) -41.043,19.943 ; -40.964,27.43 cw(c-40.959,27.471) -40.954,27.512 cw(c-40.959,27.471) -40.964,27.43 ; -40.568,27.271 cw(c-40.543,27.305) -40.518,27.338 cw(c-40.543,27.305) -40.568,27.271 ; -40.336,26.805 cw(c-40.294,26.805) -40.252,26.805 cw(c-40.294,26.805) -40.336,26.805
  lines w0.166: -46.341,27.419 -38.695,19.574 ; -46.32,18.977 -38.678,27.174 ; -44.64,26.078 -45.118,26.078 -45.118,25.225 -44.598,25.225 ; -44.203,21.316 -44.619,26.889 cw(c-44.166,26.876) -44.536,27.138 cw(c-43.853,26.655) -44.037,27.471 cw(c-43.288,24.145) -43.288,27.554 -43.205,27.554 ; -43.288,19.985 -41.043,19.985 ccw(c-41.043,20.234) -40.793,20.234 -40.294,26.639 -40.294,26.805 ccw(c-40.918,26.805) -40.543,27.305 ccw(c-41.06,26.616) -40.959,27.471 ccw(c-42.519,14.267) -42.041,27.554 ; -42.041,27.554 -42.041,27.72 -43.122,27.72 -43.122,27.388 -42.041,27.388 -42.041,27.554 ; -44.994,26.556 ccw(c-44.994,26.93) -44.994,27.305 ccw(c-44.994,26.93) -44.994,26.556 ; -44.12,19.505 cw(c-44.12,20.255) -44.12,21.005 cw(c-44.12,20.255) -44.12,19.505 ; -44.12,19.839 ccw(c-44.12,20.255) -44.12,20.671 ccw(c-44.12,20.255) -44.12,19.839 ; -41.001,27.554 cw(c-40.918,27.563) -40.835,27.554 -40.876,26.805 -40.959,26.805 -41.001,27.554
  text "BALANCER V.7.0.2" at -24.689,-0.229 h2.29
Dimensions:
  lines w0.127: -72.55,9.25 -72.55,18.75
Board Outline:
  lines w0.254: -66.099,27.245 ccw(c-66.25,26.511) -66.93,26.827 -67.416,25.785 -68.012,24.505 ; -66.099,27.245 cw(c-66.25,26.511) -65.503,26.576 -65.5,26.511 ; -68.012,24.504 cw(c-69.825,25.349) -69.825,23.349 -71.8,23.349 -71.865,23.346 ccw(c-71.8,22.599) -72.55,22.599 -72.55,5.401 ccw(c-71.8,5.401) -71.8,4.651 -69.641,4.651 cw(c-69.816,2.658) -68.003,3.503 -67.407,2.223 -66.93,1.173 ccw(c-66.25,1.489) -65.5,1.489 -65.5,8.5 cw(c-65,8.5) -64.5,8.5 -64.5,0 ccw(c-63.75,0) -63.75,-0.75 -0.75,-0.75 ccw(c-0.75,0) 0,0 0,28 ccw(c-0.75,28) -0.75,28.75 -63.75,28.75 ccw(c-63.75,28) -64.5,28 -64.5,19.5 cw(c-65,19.5) -65.5,19.5 -65.5,26.511 ; -68.012,24.504 -68.012,24.505 ; -65.5,26.511 ccw(c-66.311,26.511) -65.5,26.511 ; -38.179,5.5 ccw(c-37.425,5.5) -37.425,4.746 ; -38.179,5.5 ccw(c-37.425,5.5) -37.425,4.746 ; -38.179,5.5 ccw(c-37.425,5.5) -37.425,4.746 ; -38.179,5.5 -38.179,6 ; -38.179,6 cw(c-37.425,6) -37.425,6.754 ; -38.179,6 cw(c-37.425,6) -37.425,6.754 ; -38.179,6 cw(c-37.425,6) -37.425,6.754 ; -38.179,8.8 ccw(c-37.425,8.8) -37.425,8.046 ; -38.179,8.8 ccw(c-37.425,8.8) -37.425,8.046 ; -38.179,8.8 ccw(c-37.425,8.8) -37.425,8.046 ; -38.179,8.8 -38.179,9.3 ; -38.179,9.3 cw(c-37.425,9.3) -37.425,10.054 ; -38.179,9.3 cw(c-37.425,9.3) -37.425,10.054 ; -38.179,9.3 cw(c-37.425,9.3) -37.425,10.054 ; -38.179,12.1 ccw(c-37.425,12.1) -37.425,11.346 ; -38.179,12.1 ccw(c-37.425,12.1) -37.425,11.346 ; -38.179,12.1 ccw(c-37.425,12.1) -37.425,11.346 ; -38.179,12.1 -38.179,12.6 ; -38.179,12.6 cw(c-37.425,12.6) -37.425,13.354 ; -38.179,12.6 cw(c-37.425,12.6) -37.425,13.354 ; -38.179,12.6 cw(c-37.425,12.6) -37.425,13.354 ; -38.179,15.4 ccw(c-37.425,15.4) -37.425,14.646 ; -38.179,15.4 ccw(c-37.425,15.4) -37.425,14.646 ; -38.179,15.4 ccw(c-37.425,15.4) -37.425,14.646 ; -38.179,15.4 -38.179,15.9 ; -38.179,15.9 cw(c-37.425,15.9) -37.425,16.654 ; -38.179,15.9 cw(c-37.425,15.9) -37.425,16.654 ; -38.179,15.9 cw(c-37.425,15.9) -37.425,16.654 ; -38.179,18.7 ccw(c-37.425,18.7) -37.425,17.946 ; -38.179,18.7 ccw(c-37.425,18.7) -37.425,17.946 ; -38.179,18.7 ccw(c-37.425,18.7) -37.425,17.946 ; -38.179,18.7 -38.179,19.2 ; -38.179,19.2 cw(c-37.425,19.2) -37.425,19.954 ; -38.179,19.2 cw(c-37.425,19.2) -37.425,19.954 ; -38.179,19.2 cw(c-37.425,19.2) -37.425,19.954 ; -38.179,22 ccw(c-37.425,22) -37.425,21.246 ; -38.179,22 ccw(c-37.425,22) -37.425,21.246 ; -38.179,22 ccw(c-37.425,22) -37.425,21.246 ; -38.179,22 -38.179,22.5 ; -38.179,22.5 cw(c-37.425,22.5) -37.425,23.254 ; -38.179,22.5 cw(c-37.425,22.5) -37.425,23.254 ; -38.179,22.5 cw(c-37.425,22.5) -37.425,23.254 ; -37.425,4.746 -15.425,4.746 ; -37.425,6.754 -15.425,6.754 ; -37.425,8.046 -15.425,8.046 ; -37.425,10.054 -15.425,10.054 ; -37.425,11.346 -15.425,11.346 ; -37.425,13.354 -15.425,13.354 ; -37.425,14.646 -15.425,14.646 ; -37.425,16.654 -15.425,16.654 ; -37.425,17.946 -15.425,17.946 ; -37.425,19.954 -15.425,19.954 ; -37.425,21.246 -15.425,21.246 ; -37.425,23.254 -15.425,23.254 ; -15.425,4.746 ccw(c-15.425,5.5) -14.671,5.5 ; -15.425,4.746 ccw(c-15.425,5.5) -14.671,5.5 ; -15.425,4.746 ccw(c-15.425,5.5) -14.671,5.5 ; -15.425,6.754 cw(c-15.425,6) -14.671,6 ; -15.425,6.754 cw(c-15.425,6) -14.671,6 ; -15.425,6.754 cw(c-15.425,6) -14.671,6 ; -15.425,8.046 ccw(c-15.425,8.8) -14.671,8.8 ; -15.425,8.046 ccw(c-15.425,8.8) -14.671,8.8 ; -15.425,8.046 ccw(c-15.425,8.8) -14.671,8.8 ; -15.425,10.054 cw(c-15.425,9.3) -14.671,9.3 ; -15.425,10.054 cw(c-15.425,9.3) -14.671,9.3 ; -15.425,10.054 cw(c-15.425,9.3) -14.671,9.3 ; -15.425,11.346 ccw(c-15.425,12.1) -14.671,12.1 ; -15.425,11.346 ccw(c-15.425,12.1) -14.671,12.1 ; -15.425,11.346 ccw(c-15.425,12.1) -14.671,12.1 ; -15.425,13.354 cw(c-15.425,12.6) -14.671,12.6 ; -15.425,13.354 cw(c-15.425,12.6) -14.671,12.6 ; -15.425,13.354 cw(c-15.425,12.6) -14.671,12.6 ; -15.425,14.646 ccw(c-15.425,15.4) -14.671,15.4 ; -15.425,14.646 ccw(c-15.425,15.4) -14.671,15.4 ; -15.425,14.646 ccw(c-15.425,15.4) -14.671,15.4 ; -15.425,16.654 cw(c-15.425,15.9) -14.671,15.9 ; -15.425,16.654 cw(c-15.425,15.9) -14.671,15.9 ; -15.425,16.654 cw(c-15.425,15.9) -14.671,15.9 ; -15.425,17.946 ccw(c-15.425,18.7) -14.671,18.7 ; -15.425,17.946 ccw(c-15.425,18.7) -14.671,18.7 ; -15.425,17.946 ccw(c-15.425,18.7) -14.671,18.7 ; -15.425,19.954 cw(c-15.425,19.2) -14.671,19.2 ; -15.425,19.954 cw(c-15.425,19.2) -14.671,19.2 ; -15.425,19.954 cw(c-15.425,19.2) -14.671,19.2 ; -15.425,21.246 ccw(c-15.425,22) -14.671,22 ; -15.425,21.246 ccw(c-15.425,22) -14.671,22 ; -15.425,21.246 ccw(c-15.425,22) -14.671,22 ; -15.425,23.254 cw(c-15.425,22.5) -14.671,22.5 ; -15.425,23.254 cw(c-15.425,22.5) -14.671,22.5 ; -15.425,23.254 cw(c-15.425,22.5) -14.671,22.5 ; -14.671,5.5 -14.671,6 ; -14.671,8.8 -14.671,9.3 ; -14.671,12.1 -14.671,12.6 ; -14.671,15.4 -14.671,15.9 ; -14.671,18.7 -14.671,19.2 ; -14.671,22 -14.671,22.5
Fabrication:
  drawing of 191 lines, arcs and shapes, not listed
  text "Fabrication Notes:" at 12.831,35.334 h6
  text "Board Thickness: 0.8mm" at 12.653,28.156 h4
  text "Copper Weight: 2Oz" at 12.653,23.268 h4
  text "Layer" at 14.395,13.614 h1.52
  text "Name" at 24.807,13.614 h1.52
  text "Material" at 48.423,13.614 h1.52
  text "Thickness" at 70.261,13.614 h1.52
  text "Constant" at 86.766,13.614 h1.52
  text "Board Layer Stack" at 101.241,13.614 h1.52
  text "Top Overlay" at 24.807,10.566 h1.52
  text "Top Solder" at 24.807,7.518 h1.52
  text "Solder Resist" at 48.423,7.518 h1.52
  text "0.010mm" at 70.261,7.518 h1.52
  text "3.5" at 86.766,7.518 h1.52
  text "1" at 14.395,4.47 h1.52
  text "Top Layer" at 24.807,4.47 h1.52
  text "0.075mm" at 70.261,4.47 h1.52
  text "Dielectric 1" at 24.807,1.422 h1.52
  text "FR-4" at 48.423,1.422 h1.52
  text "0.630mm" at 70.261,1.422 h1.52
  text "4.8" at 86.766,1.422 h1.52
  text "2" at 14.395,-1.626 h1.52
  text "Bottom Layer" at 24.807,-1.626 h1.52
  text "0.075mm" at 70.261,-1.626 h1.52
  text "Bottom Solder" at 24.807,-4.674 h1.52
  text "Solder Resist" at 48.423,-4.674 h1.52
  text "0.010mm" at 70.261,-4.674 h1.52
  text "3.5" at 86.766,-4.674 h1.52
  text "Bottom Overlay" at 24.807,-7.722 h1.52
  text "Total board thickness:" at 14.395,-10.77 h1.52
  text "0.800mm" at 70.261,-10.77 h1.52
Drill Drawing:
  circle w0.254: c-72.682,72.195 r0.847
  lines w0.254: -73.529,63.729 -71.836,63.729 -71.836,65.422 -73.529,65.422 -73.529,63.729 ; -73.529,69.232 -71.836,69.232 -72.682,67.539 -73.529,69.232
  lines w0.381: -75.048,62.586 103.009,62.586 ; -75.048,74.016 103.009,74.016 ; -61.055,58.776 -61.055,77.826 ; -46.073,58.776 -46.073,77.826 ; -18.141,58.776 -18.141,77.826 ; -5.292,58.776 -5.292,77.826 ; 13.346,58.776 13.346,77.826 ; 51.435,58.776 51.435,77.826 ; 66.417,58.776 66.417,77.826 ; 85.36,58.776 85.36,77.826 ; -75.048,58.776 103.009,58.776 103.009,77.826 -75.048,77.826 -75.048,58.776
  text "Symbol" at -72.762,75.159 h1.83
  text "Count" at -59.912,75.159 h1.83
  text "Hole Size" at -44.93,75.159 h1.83
  text "Plated" at -16.998,75.159 h1.83
  text "Hole Type" at -4.149,75.159 h1.83
  text "Drill Layer Pair" at 14.489,75.159 h1.83
  text "Via/Pad" at 52.578,75.159 h1.83
  text "Pad Shape" at 67.56,75.159 h1.83
  text "Template" at 86.503,75.159 h1.83
  text "112" at -59.912,71.349 h1.52
  text "11.81mil (0.300mm)" at -44.93,71.349 h1.52
  text "PTH" at -16.998,71.349 h1.52
  text "Round" at -4.149,71.349 h1.52
  text "Top Layer - Bottom Layer" at 14.489,71.349 h1.52
  text "Via" at 52.578,71.349 h1.52
  text "Rounded" at 67.56,71.349 h1.52
  text "v60h30" at 86.503,71.349 h1.52
  text "4" at -59.912,67.539 h1.52
  text "23.62mil (0.600mm)" at -44.93,67.539 h1.52
  text "PTH" at -16.998,67.539 h1.52
  text "Round" at -4.149,67.539 h1.52
  text "Top Layer - Bottom Layer" at 14.489,67.539 h1.52
  text "Pad" at 52.578,67.539 h1.52
  text "(Mixed)" at 67.56,67.539 h1.52
  text "(Mixed)" at 86.503,67.539 h1.52
  text "7" at -59.912,63.729 h1.52
  text "35.43mil (0.900mm)" at -44.93,63.729 h1.52
  text "PTH" at -16.998,63.729 h1.52
  text "Round" at -4.149,63.729 h1.52
  text "Top Layer - Bottom Layer" at 14.489,63.729 h1.52
  text "Pad" at 52.578,63.729 h1.52
  text "(Mixed)" at 67.56,63.729 h1.52
  text "(Mixed)" at 86.503,63.729 h1.52
  text "123 Total" at -59.912,59.919 h1.52

## Dimensions
-64.5,0 to -65.5,1.489 on Dimensions
-71.8,4.651 to -71.8,23.349 on Dimensions
-0.75,28.75 to -0.75,-0.75 on Dimensions
-64.5,28 to 0,28 on Dimensions

## Text inside footprints (layer, text, board x,y; h text height)
PS1: Bottom Overlay "+" at -49.403,5.707 h3 r180
PS2: Bottom Overlay "+" at -13.197,23.241 h3